# Altium PCB SOM_PCB_6Layer.PcbDoc (part 3 of 6)
Units mil, origin at the board's own origin, x right, y up, seen from the top; angles counter-clockwise.
Board outline 1230 x 2725 mil, 6 copper layers (Top Layer, GND+SHIELD, MidLayer1, MidLayer2, PWR, Bottom Layer), stack 60.8 mil thick; 76 components, 194 nets, 972 pads, 577 vias.
Unrouted connection lines stored in the file: 151.
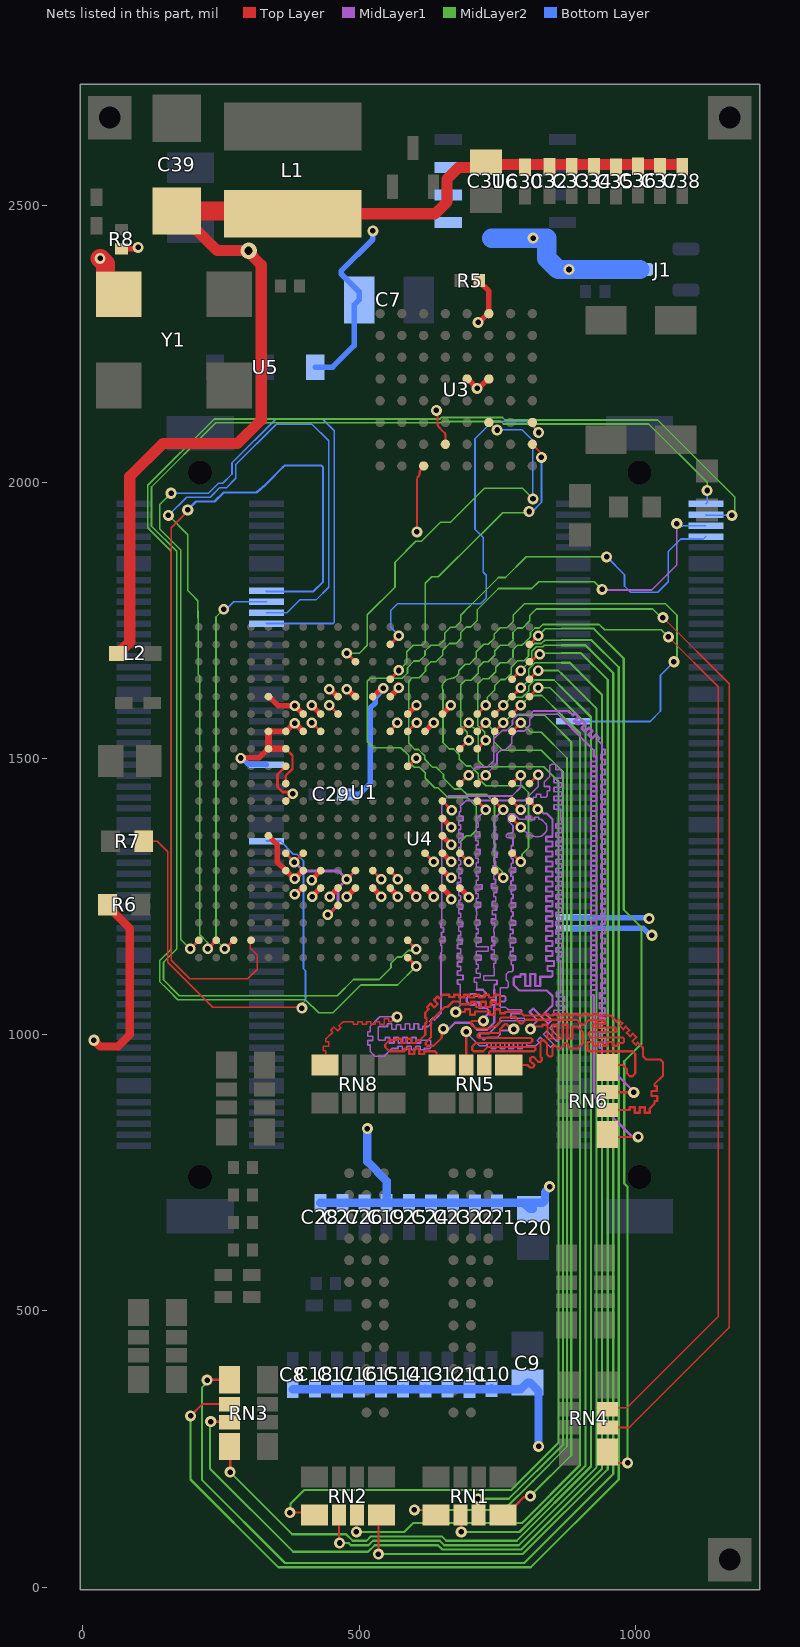
[diagram p6: the nets of this part, all layers, seen from the top]

## Via types
v1: diameter 19, hole 10, Top Layer to Bottom Layer, tented both sides, 352 vias
v2: diameter 20, hole 10, Top Layer to Bottom Layer, tented both sides, 223 vias
v3: diameter 20, hole 10, Top Layer to Bottom Layer, 1 vias
v4: diameter 30, hole 15, Top Layer to Bottom Layer, tented both sides, 1 vias

## Nets (pads, with @x,y where several pads share a name; then routed paths per layer and width w, separated by ;. In a path a pad name is that pad's centre, name@x,y a point inside that pad or via, vN(x,y) a via of type N, cw(c..) or ccw(c..) an arc to the next point about the centre after c; other vN are vias at no path point) (continued)
+3V3: C7.1 C8.2 C9.2 C10.2 C11.2 C12.2 C13.2 C14.2 C15.2 C16.2 C17.2 C18.2 C19.2 C20.2 C21.2 C22.2 C23.2 C24.2 C25.2 C26.2 C27.2 C28.2 C29.2 J1.3 R5.2 R6.2 R8.1 U1.E5 U1.E9 U1.E10 U1.E11 U1.E12 U1.F7 U1.F8 U1.F13 U1.F15 U1.G5 U1.G6 U1.G7 U1.G14 U1.H5 U1.H6 U1.K6 U1.M15 U1.N5 U1.N15 U1.P15 U1.R6 U1.R7 U1.R8 U1.R15 U1.T7 U1.T8 U1.T9 U1.T10 U1.T11 U1.T12 U1.T13 U1.T14 U1.T15 U1.T16 U3.A6 U3.D5 U3.D6 U3.G4 U3.H3 U4.71 U4.117 U4.118 U5.1 U6.1 U6.2 U6.3 Y1.4 | length 4143.3
  Top Layer w4: U1.K6@367.52,1454.49 367.52,1469.01 379.52,1481.01 379.52,1505.48 U1.H6@367.52,1517.48 ; v2(604.5,1910.06) 605,1910.56 605,2000.7 cw(c645.59,2000.7) 605.66,2008.01 cw(c609.59,2007.26) 606.74,2010.07 ; 606.76,2010.09 607.52,2010.85 ; 607.54,2010.87 ccw(c601.52,2016.87) 610.02,2016.87 610.02,2019.2 cw(c614.02,2019.2) 610.57,2021.23 cw(c645.59,2000.7) U3.H3@616.89,2029.41 ; v2(640,2130) 640.59,2129.41 cw(c637.76,2126.58) 641.76,2126.58 641.76,2108.15 ccw(c656.26,2108.15) 646.01,2097.9 655.07,2088.83 cw(c652.26,2085.99) 656.26,2085.99 656.26,2071.3 U3.G4@655,2070.04
  Top Layer w5: v1@383.27,1596 v1@383.38,1596 ; v1(383.58,1254) v1@385.39,1254 ; U1.T7@396.9,1265.51 U1.T7@399.02,1265.51 ; U1.R7@398.65,1297.01 U1.R7@399.02,1297.01 ; U1.F7@398.91,1580.47 U1.F7@399.02,1580.47 ; v1(414.76,1280) v1@414.76,1281.26 ; v1(414.76,1596) v1@414.87,1596 ; U1.F8@430.4,1580.47 U1.F8@430.51,1580.47 ; v1(446.26,1625.21) v1@447.51,1625.21 ; v1(447.11,1249.76) v1@447.11,1250.19 ; U1.E9@460.76,1611.97 U1.E9@462.01,1611.97 ; U1.T9@462.01,1265.09 U1.T9@462.01,1265.51 ; v1(477.76,1625.21) v1@479.01,1625.21 ; U1.E10@492.25,1611.97 U1.E10@493.5,1611.97 ; U1.T11@525,1265.14 U1.T11@525,1265.51 ; v1(540,1249.76) v1@540,1250.14 ; U1.T12@556.5,1264.39 U1.T12@556.5,1265.51 ; v1(570,1249.76) v1@570,1250.89 ; v1@603.74,1596.22 v1(604,1596.22) ; U1.R15@650.98,1297.01 U1.R15@652.24,1297.01 ; U1.F15@650.98,1580.47 U1.F15@650.98,1580.84 ; v1@665.48,1283.76 v1(666.73,1283.76) ; v1@666,1595.85 v1(666,1596.22) ; v1(666.73,1245.52) v1@666.73,1249.76 ; v1(698.23,1249) v1@698.23,1249.76
  Top Layer w10: R8.1@70,2422.48 97.48,2422.48 v2(100,2425) ; v1(285.69,1500.81) 285.87,1500.98 318.45,1500.98 334.94,1517.48 U1.H5@336.02,1517.48 ; U1.N5@336.02,1360 351.77,1344.25 351.77,1312.76 U1.R6@367.52,1297.01 367.89,1297.01 382.9,1282 v1(383.27,1282) 383.64,1282 U1.R7@398.65,1297.01 ; U1.G5@336.02,1548.98 U1.G6@367.52,1548.98 368.15,1548.98 383.27,1564.1 v1(383.9,1564.1) U1.G7@399.02,1548.98 ; U1.E5@336.02,1611.97 337.07,1611.97 353.56,1595.47 383.01,1595.47 v1(383.27,1595.21) ; v1@383.38,1596 U1.F7@398.91,1580.47 ; v1@385.39,1254 U1.T7@396.9,1265.51 ; v1@414.76,1281.26 U1.R8@430.51,1297.01 ; v1@414.87,1596 U1.F8@430.4,1580.47 ; v1(414.9,1249.9) U1.T8@430.51,1265.51 ; v1@447.11,1250.19 U1.T9@462.01,1265.09 ; v1@447.51,1625.21 U1.E9@460.76,1611.97 ; v1(477.76,1249.76) U1.T10@493.5,1265.51 ; v1@479.01,1625.21 U1.E10@492.25,1611.97 ; U1.T11@525,1265.14 v1@540,1250.14 ; U1.E11@525,1611.97 526.08,1611.97 539.47,1625.35 541.95,1625.35 v1(543.67,1627.07) ; U1.T12@556.5,1264.39 v1@570,1250.89 ; U1.E12@556.5,1611.97 v1(572.24,1627.72) ; U1.T13@587.99,1265.51 v1(603.74,1249.76) ; U1.F13@587.99,1580.47 v1@603.74,1596.22 ; U1.T14@619.49,1265.51 v1(635.24,1249.76) ; U1.G14@619.49,1548.98 v1(635.24,1564.72) ; U1.T15@650.98,1265.51 v1@666.73,1249.76 ; U1.P15@650.98,1328.5 v1(666.73,1312.76) ; U1.N15@650.98,1360 v1(666.73,1344.25) ; U1.M15@650.98,1391.5 v1(666.73,1375.75) ; U1.F15@650.98,1580.84 v1@666,1595.85 ; U1.R15@652.24,1297.01 v1@665.48,1283.76 ; U1.T16@682.48,1265.51 v1@698.23,1249.76 ; U3.D5@695.63,2186.89 696.87,2186.89 v2(713.76,2170) 716.22,2170 733.11,2186.89 U3.D6@735,2186.89 ; v2(715.62,2289.38) 717.5,2289.38 733.12,2305 U3.A6@735,2305 735,2345.75 717.52,2363.23 R5.2@717.52,2365
  Top Layer w12: U1.G5@336.02,1548.98 U1.H5@336.02,1517.48 U1.H6@367.52,1517.48
  Top Layer w15: v2(20,990) 31.29,978.71 63.71,978.71 85,1000 85,1192.52 44.88,1232.64 R6.2@44.88,1235
  Top Layer w35: v2(31.5,2405) 41.16,2395.34 41.16,2364.19 Y1.4@65,2340.35
  Bottom Layer w10: v1(285.69,1500.81) 288.13,1500.81 299.77,1489.17 331.54,1489.17 U4.71@332.44,1488.27 ; U5.1@420.55,2208.3 452.05,2208.3 491,2247.25 491,2321 C7.1@500,2330 500,2344.76 467.44,2377.32 467.44,2382.2 525,2439.76 v2(525,2455) ; C29.2@475.76,1435 500,1435 520,1455 520,1591.11 529.57,1600.68 529.57,1610.54 543.67,1624.64 v1(543.67,1627.07) ; U4.117@887.56,1192.99 1014.3,1192.99 1027.29,1180 v2(1030,1180) ; U4.118@887.56,1212.68 888.46,1211.77 1023.23,1211.77 v2(1025,1210)
  Bottom Layer w15: C8.2@380,358.47 C14.2@580.76,358.47 ; C28.2@430,695.76 C27.2@470,695.76 C19.2@550,695.76 ; v2(515,830) 515,770.23 550,735.23 C19.2@550,695.76 ; C14.2@580,359.24 C14.2@580.76,358.47 ; C13.2@620,359.24 C13.2@619.24,358.47 ; C10.2@740,360 C10.2@740,358.47 ; C20.2@815,684.41 809.29,684.41 C20.2@797.94,695.76 ; v2(825,255) 825,354.86 809.27,370.59 C9.2@805,370.59 792.88,358.47 C10.2@740,358.47 ; v2(845,725) 845,723.65 836.44,715.08 836.44,700.14 832.06,695.76 C20.2@797.94,695.76 ; C19.2@550,695.76 C25.2@590,695.76 C20.2@797.94,695.76 ; C14.2@580.76,358.47 C13.2@619.24,358.47 ; C13.2@619.24,358.47 C11.2@700,358.47 C10.2@740,358.47
  Bottom Layer w35: 740,2441.75 790,2441.75 v2(815,2441.75) 840,2441.75 840,2405 860,2385 v2(880,2385) J1.3@1008.27,2385
+VDD_INT: C30.2 C31.2 C32.2 C33.2 C34.2 C35.2 C36.2 C37.2 C38.2 C39.1 L1.2 L2.1 U1.F9 U1.G8 U1.G12 U1.G13 U1.J6 U1.J13 U1.L6 U1.L15 U1.P6 U1.P7 U1.P14 U1.R10 U1.R11 U1.R12 U1.U9 | length 2768.4
  Top Layer w5: U1.P6@367.52,1328.5 367.52,1327.87 382.63,1312.76 v1(382.63,1312.12) ; U1.L6@367.52,1422.99 v1(380.28,1435.75) ; U1.J6@367.52,1485.98 352.52,1470.98 352.52,1448.28 361.31,1439.49 382.52,1439.49 v1@383.27,1438.74 ; v1@383.27,1312.76 U1.P7@399.02,1328.5 ; v1(414.76,1564.72) U1.G8@430.51,1548.98 ; v1(443.76,1216.99) 445.03,1218.27 446.26,1218.27 U1.U9@462.01,1234.02 ; v1(446.26,1596) 446.37,1596 461.9,1580.47 U1.F9@462.01,1580.47 ; v1(477.76,1281.26) U1.R10@493.5,1297.01 ; U1.R11@525,1297.01 525,1296.63 540,1281.63 v1(540,1281.26) ; U1.R12@556.5,1297.01 556.5,1295.89 570,1282.38 v1(570,1281.26) ; U1.G12@556.5,1548.98 556.5,1550.47 569.26,1563.23 v1(569.26,1564.72) ; U1.J13@587.99,1485.98 588.74,1485.98 602.99,1500.24 v1(603.74,1500.24) ; U1.G13@587.99,1548.98 603.48,1564.46 v1(604.26,1564.46) ; U1.P14@619.49,1328.5 v1(635.24,1312.76) ; U1.L15@650.98,1422.99 666.73,1407.24 v1(667.59,1406.38)
  Top Layer w10: C39.1@170,2490.89 C39.1@171.37,2490.89 ; L1.2@374.98,2490.89 L1.2@380,2485.87 L1.2@465,2485.87 ; C32.2@845,2570.76 C33.2@885,2570.76 ; C34.2@925,2570.76 C35.2@965,2570.76 ; C36.2@1005,2570.76 C37.2@1045,2570.76
  Top Layer w20: L2.1@64.49,1690 67.44,1690 71.22,1693.78 71.22,1696.73 85,1710.51 85,2010 145,2070 280,2070 323,2113 323,2393.29 300,2416.29 v4(300,2419) ; C39.1@171.37,2490.89 243.26,2419 296,2419 v4@300,2415 ; L1.2@465,2485.87 637.66,2485.87 659,2507.2 659,2549 680,2570 720.59,2570 C31.2@727.15,2576.56 ; C31.2@730,2579.41 C31.2@727.15,2576.56 ; C38.2@1085,2570.76 1085,2574.24 1084.16,2575.09 1045,2575.09 1005,2575.09 965,2575.09 925,2575.09 885,2575.09 845,2575.09 800,2575.09 728.61,2575.09 C31.2@727.15,2576.56
  Top Layer w35: C39.1@171.37,2490.89 L1.2@374.98,2490.89
  MidLayer1 w5: v1(382.63,1312.12) 383.9,1312.12 399.76,1296.26 462.76,1296.26 v1(477.76,1281.26) 462.11,1265.62 462.11,1235.35 v1(443.76,1216.99)
A\O\E\: U1.C10 U3.F6 | length 748.7
  Top Layer w3: U3.F6@735,2108.15 735.68,2108.15 749.32,2094.5 v2(750,2094.5)
  Top Layer w5: v1(477.76,1690.71) U1.C10@493.5,1674.96
  MidLayer2 w3: v1(477.76,1690.71) 500.71,1690.71 515,1705 515,1760 565,1810 565,1855.42 602.79,1893.21 613.21,1893.21 647.42,1927.42 665.5,1927.42 727.08,1989 795.87,1989 v2(814.87,1970)
  Bottom Layer w3: v2(750,2094.5) 750.5,2095 795,2095 814.5,2075.5 814.5,1970.37 v2(814.87,1970)
A\R\E\: U1.B12 U3.F8 | length 712.4
  Top Layer w3: U3.F8@813.74,2108.15 813.74,2104.7 825,2093.44 v2(825,2090)
  Top Layer w5: U1.B12@556.5,1706.46 v1(572.24,1722.2)
  Bottom Layer w3: v1(572.24,1722.2) 557.24,1737.2 557.24,1767.72 569.52,1780 720,1780 730.5,1790.5 730.5,1831.54 725,1837.04 725,1900 710,1915 710,2078.69 741.31,2110 805,2110 v2(825,2090)
A\W\E\: U1.D12 U3.G8 | length 594
  Top Layer w3: U3.G8@813.74,2068.78 830,2052.52 v2(830,2045)
  Top Layer w5: U1.D12@556.5,1643.46 v1(572.24,1659.21)
  MidLayer2 w3: v1(572.24,1659.21) 586.62,1673.59 586.62,1693.39 598.23,1705 615,1705 620,1710 620,1815.68 620,1816.92 631.77,1828.69 643.23,1828.69 679.55,1865 680,1865 760,1945 806.25,1945 808.01,1946.76 v2(808.01,1946.99)
  Bottom Layer w3: v2(808.01,1946.99) 809.25,1945.75 812.54,1945.75 830.37,1963.58 830.37,2044.63 v2(830,2045)
ATAPI_PDIAG: U1.P19 U4.134 | length 1325.8
  Top Layer w5: U1.P19@776.97,1328.5 v1(792.72,1312.76)
  MidLayer2 w3: v1(792.72,1312.76) 795.02,1315.06 795.02,1326.76 806.72,1338.45 806.72,1438.28 794.27,1450.73 729.2,1450.73 715.72,1464.2 715.72,1472.3 701.8,1486.22 693.94,1486.22 681.37,1498.79 681.37,1506.66 670.98,1517.04 663.12,1517.04 652,1528.16 652,1623.49 651.34,1625.87 cw(c664.82,1629.62) 661.12,1643.13 670.48,1645.72 ccw(c666.73,1659.21) 676.63,1649.31 680.73,1653.41 680.73,1659.01 692.43,1670.71 700,1670.71 712.23,1682.94 712.23,1693.01 725.67,1706.46 733.78,1706.46 744.6,1717.28 744.6,1725.38 755.86,1736.64 767.74,1736.64 779,1747.9 779,1759.5 799.5,1780 1054.77,1780 1075.5,1759.27 1075.5,1680.5 v2(1070,1675)
  Bottom Layer w3: U4.134@887.56,1567.01 1027.01,1567.01 1045.75,1585.75 1045.75,1650.75 v2(1070,1675)
B\R\: R7.2 U4.76 | length 883
  Top Layer w3: R7.2@110.24,1350 135,1350 154,1331 154,1131 235.5,1049.5 394.88,1049.5 v2(396.38,1048)
  Bottom Layer w3: U4.76@332.44,1350.47 358.03,1350.47 369.27,1339.24 369.27,1338.45 380.99,1326.73 387.82,1326.73 399.55,1315 399.55,1119.19 403.01,1115.74 403.01,1061.99 394.99,1053.98 394.99,1049.39 v2(396.38,1048)
BMODE0: U1.W1 U4.60 | length 1720.4
  Top Layer w5: v1(194.29,1155.28) U1.W1@210.04,1171.02
  MidLayer2 w3: v2(160,1980) 139.5,1959.5 139.5,1915.3 177,1877.8 177,1172.57 v1(194.29,1155.28)
  Bottom Layer w3: v2(160,1980) 227.55,1980 245.78,1998.22 253.22,1998.22 270,2015 270,2035 350,2115 433.14,2115 455,2093.14 455,1745.93 453.24,1744.17 U4.60@332.44,1744.17
BMODE1: U1.W2 U4.59 | length 1618.2
  Top Layer w5: v1(225.79,1155.28) U1.W2@241.54,1171.02
  MidLayer2 w3: v2(155,1940) 190,1905 190,1803.98 197.74,1796.24 208.29,1785.69 208.29,1780.7 ; 208.29,1780.67 208.49,1754.65 ccw(c211.49,1754.7) 208.62,1753.84 209.04,1752.43 cw(c206.17,1751.55) 209.17,1751.55 209.17,1651.88 211.79,1649.26 211.79,1180.97 225.79,1166.97 v1(225.79,1155.28)
  Bottom Layer w3: v2(155,1940) 188,1973 230.45,1973 247.45,1990 260,1990 277,2007 277,2032.1 349.9,2105 415,2105 445,2075 445,1810 421.95,1786.95 392.55,1786.95 369.45,1763.86 U4.59@332.44,1763.86
BMODE2: U1.W3 U4.58 | length 732.1
  Top Layer w5: v1(257.28,1155.28) U1.W3@273.03,1171.02
  MidLayer2 w3: v1(255.25,1769.75) 254,1769 241,1756 241,1171.56 v1(257.28,1155.28)
  Bottom Layer w3: v1(255.25,1769.75) 260.46,1770.88 273.13,1783.54 U4.58@332.44,1783.54
BMODE3: U1.W4 U4.57 | length 1658.8
  Top Layer w3: v2(190,1950) 190,1947.72 160,1917.72 160,1796.24 160,1135 193.59,1101.41 298.69,1101.41 316.03,1118.75 316.03,1144.29 303.22,1157.1 303.22,1169.71 U1.W4@304.53,1171.02
  Bottom Layer w4: v2(190,1950) 205,1965 238.5,1965 255,1981.5 314.43,1981.5 330.39,1995.1 335.18,1999.79 ccw(c323.66,2011.6) 335.42,2000.03 362.07,2027.07 365,2030 432.07,2030 435,2027.07 435,1820 417.33,1802.33 333.34,1802.33 U4.57@332.44,1803.23
CAN0_RX: U1.R18 U4.153 | length 1226.6
  Top Layer w5: U1.R18@745.47,1297.01 746.61,1297.01 759.86,1283.76 v1(761,1283.76)
  MidLayer1 w3: v2(940,1806) 941,1805 1030,1805 1075,1850 v2(1075,1925)
  MidLayer2 w3: v1(761,1283.76) 760.68,1283.76 758.92,1285.52 758.92,1295.26 745.12,1309.06 745.12,1419.88 730,1435 695,1435 685.28,1444.72 672.45,1444.72 652.73,1464.44 652.73,1471.07 639.56,1484.24 632.93,1484.24 618.74,1498.43 618.74,1505.04 607.54,1516.23 600.94,1516.23 589.74,1527.43 589.74,1639.74 596.01,1646.01 608.75,1646.01 620.43,1657.69 620.43,1665.03 630.37,1674.97 639.29,1674.97 651.45,1687.12 651.45,1696.05 663.61,1708.2 675.8,1708.2 684.21,1716.61 684.21,1728.04 694.14,1737.97 702.3,1737.97 713.65,1749.32 713.65,1768.65 752.5,1807.5 812.7,1807.5 825.2,1820 926,1820 v2(940,1806)
  Bottom Layer w3: v2(1075,1925) 1080,1920 1085,1920 1086.34,1921.34 U4.153@1127.72,1921.34
CAN0_TX: U1.P16 U4.154 | length 1354.4
  Top Layer w5: U1.P16@682.48,1328.5 v1(698.23,1312.76)
  MidLayer2 w3: v1(698.23,1312.76) 684.23,1326.76 684.23,1350.05 694.18,1360 702.28,1360 712.23,1369.95 712.23,1413.04 696.27,1429 661,1429 642.78,1447.22 636.98,1447.22 619.76,1464.44 619.76,1474.01 609.54,1484.24 599.94,1484.24 589.74,1494.44 589.74,1505.26 575.77,1519.23 525.77,1519.23 515,1530 515,1640 520.21,1645.21 578.04,1645.21 587.6,1654.77 587.6,1664.45 599.57,1676.43 609.26,1676.43 619.35,1686.52 619.35,1694.62 629.54,1704.81 644.81,1704.81 655,1715 655,1727 665.45,1737.45 673.55,1737.45 684,1747.9 684,1759.27 699.73,1775 700,1775 752.45,1827.45 764.95,1827.45 802.5,1865 v2(948.18,1865)
  Bottom Layer w3: v2(948.18,1865) 980.5,1832.68 980.5,1812.22 991.61,1801.11 1040.61,1801.11 1059.5,1820 1059.5,1874.5 1082.25,1897.25 1123.31,1897.25 U4.154@1127.72,1901.65
CAN1_RX: U1.W13 U4.151 | length 2592.8
  Top Layer w5: U1.W13@587.99,1171.02 587.99,1170.51 603.22,1155.28 v1(603.22,1154.76)
  MidLayer2 w3: v1(603.22,1154.76) 600.92,1152.46 589.22,1152.46 577.41,1140.64 569.3,1140.64 557.93,1129.26 557.93,1121.16 536.77,1100 490,1100 460.5,1070.5 174.7,1070.5 163.96,1081.24 151.75,1093.45 146,1099.2 146,1131 170,1155 170,1513.78 170,1874.9 124.5,1920.4 124.5,1991.42 240.58,2107.5 649.32,2107.5 651.82,2110 756.92,2110 761.42,2105.5 1024.5,2105.5 1130,2000 v2(1130,1985)
  Bottom Layer w3: U4.151@1127.72,1960.71 1130,1962.99 v2(1130,1985)
CAN1_TX: U1.Y13 U4.152 | length 2725.6
  Top Layer w5: U1.Y13@587.99,1139.53 588.1,1139.53 603.63,1124 v1(603.74,1124)
  MidLayer2 w3: v1(603.74,1124) 569.74,1090 503.23,1090 452.73,1039.5 426.8,1039.5 402.8,1063.5 171.8,1063.5 154.06,1081.24 151.75,1083.55 139,1096.3 139,1133.9 160,1154.9 160,1875 117.5,1917.5 117.5,1994.32 237.68,2114.5 646.42,2114.5 648.92,2117 759.82,2117 764.32,2112.5 1040.73,2112.5 1180,1973.23 1180,1945 v2(1175,1940)
  Bottom Layer w3: U4.152@1127.72,1941.02 1128.74,1940 v2(1175,1940)
DDR_A0: RN1.1 U1.G19 | length 1746.4
  Top Layer w3: v2(600,140) 630,140 RN1.1@639.5,130.5
  Top Layer w5: U1.G19@776.97,1548.98 792.72,1564.72 v1(793.01,1564.72)
  MidLayer2 w3: v1(793.01,1564.72) 810.51,1547.23 830.01,1547.23 876.5,1500.74 876.5,254.13 814.31,191.94
  MidLayer2 w4: v2(600,140) 762.37,140 814.31,191.94
DDR_A1: RN1.3 U1.G17 | length 1652.6
  Top Layer w4: v2(715,160) 715,131.8 RN1.3@716.3,130.5
  Top Layer w5: U1.G17@713.98,1548.98 v1(729.72,1564.72)
  MidLayer2 w3: v1(729.72,1564.72) 744.01,1550.44 744.01,1530.64 759.65,1515 830,1515 865,1480
  MidLayer2 w4: v2(715,160) 771.06,160 869,257.94 869,1476 865,1480
DDR_A2: RN1.2 U1.E20 | length 1784.5
  Top Layer w4: RN1.2@683.65,130.5 685,129.15 v2(685,100)
  Top Layer w5: U1.E20@808.46,1611.97 824.21,1627.72 v1(824.21,1628)
  MidLayer2 w3: v1(824.21,1628) 845.48,1628 866.75,1606.73
  MidLayer2 w4: v2(685,100) 790.25,100 910,219.75 910,1563.48 866.75,1606.73
DDR_A3: RN1.4 U1.G18 | length 1630.6
  Top Layer w4: RN1.4@760.5,130.5 766,130.5 783,147.5 783,148 797.69,162.69 807.69,162.69 v2(810,165)
  Top Layer w5: U1.G18@745.47,1548.98 v1(761.22,1564.72)
  MidLayer2 w3: v1(761.22,1564.72) 775.22,1578.72 835,1578.72 866.75,1546.97
  MidLayer2 w4: v2(810,165) 884,239 884,1529.72 866.75,1546.97
DDR_A4: RN2.1 U1.G16 | length 2049.7
  Top Layer w4: v2(375,135) 415,135 RN2.1@419.5,130.5
  Top Layer w5: U1.G16@682.48,1548.98 v1(698.23,1564.72)
  MidLayer2 w3: v1(698.23,1564.72) 715.72,1547.23 715.72,1495.93 726.66,1485 834.34,1485 855,1464.34
  MidLayer2 w4: v2(375,135) 376,136 376,151 401,176 775.75,176 861,261.25 861,1458.34 855,1464.34
DDR_A5: RN2.3 U1.F19 | length 1975.8
  Top Layer w3: v2(495,100) 495,129.2 RN2.3@496.3,130.5
  Top Layer w5: U1.F19@776.97,1580.47 777.08,1580.47 792.61,1596 v1(792.72,1596)
  MidLayer2 w3: v1(792.72,1596) 792.72,1596.22 810.5,1614 831,1614 866.75,1578.25
  MidLayer2 w4: v2(495,100) 582,100 595,113 598,116 794.94,116 900,221.06 900,1545 866.75,1578.25
DDR_A6: RN2.2 U1.D20 | length 2112.4
  Top Layer w4: RN2.2@463.65,130.5 463.65,81.35 v2(465,80)
  Top Layer w5: U1.D20@808.46,1643.46 v1(824.21,1659.2)
  MidLayer2 w3: v1(824.21,1659.2) 860.79,1659.21 866.75,1653.25
  MidLayer2 w4: v2(465,80) 481.06,80 485.06,76 517.06,76 525.06,84 646.34,84 654.34,76 788.88,76 930,217.12 930,1590 866.75,1653.25
DDR_A7: RN2.4 U1.C20 | length 2148.1
  Top Layer w4: v2(535,60) 535,125 RN2.4@540.5,130.5
  Top Layer w5: U1.C20@808.46,1674.96 810.9,1674.96 824.14,1688.2 v1(826.72,1688.2)
  MidLayer2 w3: v1(826.72,1688.2) 829.22,1690.71 866.75,1690.71
  MidLayer2 w4: v2(535,60) 796.31,60 950,213.69 950,1642.23 901.53,1690.71 866.75,1690.71
DDR_A8: RN3.4 U1.F18 | length 2411.9
  Top Layer w4: RN3.4@265.5,254.5 266.84,253.16 v2(266.84,208.16)
  Top Layer w5: U1.F18@745.47,1580.47 745.58,1580.47 761.11,1596 v1(761.22,1596)
  MidLayer2 w3: v1(761.22,1596) 761.22,1596.22 775.5,1610.5 795.3,1610.5 806.86,1622.06 806.86,1630.44 818.41,1642 853,1642 866.75,1628.25
  MidLayer2 w4: v2@266.84,216.84 v2(266.84,208.16) 379,96 476.37,96 488.37,84 513.75,84 521.75,92 649.66,92 657.66,84 785.57,84 920,218.43 920,1575 866.75,1628.25
DDR_A9: RN3.3 U1.E19 | length 2585.4
  Top Layer w4: v2(231.55,299.63) 264.57,299.63 RN3.3@265.5,298.7
  Top Layer w5: U1.E19@776.97,1611.97 v1(792.72,1627.72)
  MidLayer2 w3: v1(792.72,1627.72) 807,1642 807,1661.8 818.41,1673.21 866.75,1673.21
  MidLayer2 w4: v2(231.55,299.63) 230,298.07 230,215 381,64 516.37,64 528.37,76 643.03,76 651.03,68 793,68 940,215 940,1615 881.79,1673.21 866.75,1673.21
DDR_A10: RN4.1 U1.B20 | length 1735.3
  Top Layer w4: RN4.1@950,245 950,242.02 967,225.02 v2(986,225.02)
  Top Layer w5: U1.B20@808.46,1706.46 v1(824.21,1722.2)
  MidLayer2 w3: v1(824.21,1722.2) 837.01,1735 866.75,1735
  MidLayer2 w4: 866.75,1735 925,1735 979,1681 979,1226.42 1011,1194.42 1011,983.09 979.98,952.08 979.98,730.75 986,724.73 v2(986,225.02)
DDR_A11: RN3.2 U1.F17 | length 2928.7
  Top Layer w4: v2(195,310) 216.35,331.35 RN3.2@265.5,331.35
  Top Layer w5: U1.F17@713.98,1580.47 714.09,1580.47 729.61,1596 v1(729.72,1596)
  MidLayer2 w3: v1(729.72,1596) 729.72,1596.22 732.03,1598.52 732.03,1610.22 745.85,1624.05 745.85,1632.15 756.49,1642.78 764.59,1642.78 775.22,1653.41 775.22,1665.22 786.81,1676.81 786.92,1676.71 798.52,1676.71 806.72,1684.91 806.72,1696.51 806.61,1696.61 818.31,1708.31 818.41,1708.2 830.01,1708.2 836.01,1714.2 866.75,1714.2
  MidLayer2 w4: v2(195,310) 195,195 354,36 811,36 970,195 970,1665 920.8,1714.2 866.75,1714.2
DDR_A12: RN3.1 U1.D19 | length 2786.4
  Top Layer w4: v2(225,375) 225.5,375.5 RN3.1@265.5,375.5
  Top Layer w5: U1.D19@776.97,1643.46 v1(792.74,1659.2)
  MidLayer2 w3: v1(792.74,1659.2) 812.72,1679.21 812.72,1694 820.92,1702.2 832.5,1702.2 835.29,1705 866.75,1705
  MidLayer2 w4: v2(225,375) 225,370.67 215.55,361.23 215.55,194.44 366,44 799,44 960,205 960,1654.71 909.71,1705 866.75,1705
DDR_BA0: RN4.3 U1.H17 | length 2083.1
  Top Layer w3: RN4.3@950,321.8 953.2,325 985,325 1150,490 1150,1630 v2(1060,1720)
  Top Layer w5: U1.H17@713.98,1517.48 v1(729.72,1533.23)
  MidLayer2 w3: v1(729.72,1533.23) 727.42,1535.53 727.42,1547.23 715,1559.65 715,1635 724.21,1644.21 734.52,1644.21 747.22,1656.91 747.22,1665.01 755.42,1673.21 768.21,1673.21 778.72,1683.72 778.72,1696.51 786.92,1704.71 794.71,1704.71 800,1710 800.16,1709.84 806.72,1716.41 806.72,1716.72 810.21,1720.21 810.21,1728 818.41,1736.2 826.2,1736.2 832.5,1742.5 935,1742.5 944.62,1732.88 1047.12,1732.88 v2(1060,1720)
DDR_BA1: RN4.2 U1.H16 | length 2201.8
  Top Layer w3: RN4.2@950,289.15 989.15,289.15 1170,470 1170,1635 v2(1050,1755)
  Top Layer w5: U1.H16@682.48,1517.48 v1(698.23,1533.23)
  MidLayer2 w3: v1(698.23,1533.23) 695.93,1535.53 695.93,1547.23 684.23,1558.93 684.23,1633.52 692.43,1641.72 703.04,1641.72 715.72,1654.41 715.72,1665.01 725.71,1675 733.81,1675 745.47,1686.66 745.47,1694.76 755.59,1704.88 769.88,1704.88 778.82,1713.82 778.82,1716.3 778.72,1716.41 778.72,1728 786.92,1736.2 796.2,1736.2 809.2,1749.2 809.2,1758.78 820.92,1770.5 1031.42,1770.5 v2@1041.92,1760
DDR_D0: RN5.4 U1.L18 | length 1597.9
  Top Layer w4: RN5.4@650,945 640,955 640,967.66 637.66,970 620,970 618,970 618,965 609,965 609,975 600,975 600,965 591,965 591,975 582,975 582,970 567.5,970 555,970 547.5,977.5 547.5,982.5 555,990 565,990 567,990 567,992.5 576,992.5 576,985 585,985 585,992.5 594,992.5 594,985 603,985 603,990 610,990 620,1000 620,1010 620,1021 622,1021 622,1030 620,1030 620,1040 625,1045 626.41,1046.41 622.88,1049.95 629.24,1056.31 636.31,1049.24 642.68,1055.61 635.61,1062.68 641.97,1069.04 645.51,1065.51 649.41,1069.41 652.5,1072.5 663.44,1072.5 663.44,1068 672.44,1068 672.44,1072.5 681.44,1072.5 681.44,1067.87 690.44,1067.87 690.44,1072.5 699.44,1072.5 699.44,1067.5 708.44,1067.5 708.44,1072.5 717.44,1072.5 717.44,1067.5 726.44,1067.5 726.44,1072.5 735.44,1072.5 735.44,1067.5 744.44,1067.5 744.44,1072.5 746.44,1072.5 752.5,1072.5 755,1070 755,1057.34 752.66,1055 747.5,1055 747.5,1059.5 738.5,1059.5 738.5,1050 729.5,1050 729.5,1059.5 720.5,1059.5 720.5,1050 711.5,1050 711.5,1059.5 702.5,1059.5 702.5,1055 700.5,1055 685,1055 680,1060 670,1060 660,1050 655,1050 630,1025 630,995 620.66,985.66 620.66,982.34 623,980 635,980 649.72,994.72 649.72,1004.77 v2@654.08,1009.12
  Top Layer w5: U1.L18@745.47,1422.99 745.47,1422.88 761,1407.35 v1(761,1407.24)
  MidLayer1 w3: 744.72,1081.24 744.72,1090.74 749.72,1090.74 749.72,1098.74 725.69,1098.74 725.69,1106.74 744.72,1106.74 744.72,1110 744.72,1120 744.72,1121.5 743.72,1121.5 743.72,1129.5 747.22,1129.5 747.22,1137.5 739.72,1137.5 739.72,1145.5 744.72,1145.5 744.72,1153.5 739.72,1153.5 739.72,1161.5 745.14,1161.5 745.14,1169.5 740.24,1169.5 740.24,1177.5 744.72,1177.5 744.72,1185.5 743.72,1185.5 743.72,1193.5 745.56,1193.5 745.56,1201.5 739.72,1201.5 739.72,1209.5 747.22,1209.5 747.22,1217.5 741.22,1217.5 741.22,1225.5 748.65,1225.5 748.65,1233.5 741.26,1233.5 741.26,1241.5 747.22,1241.5 747.22,1249.5 743.72,1249.5 743.72,1257.5 749.16,1257.5 749.16,1265.5 739.72,1265.5 739.72,1273.5 747,1273.5 747,1281.5 743.72,1281.5 743.72,1289.5 747,1289.5 747,1297.5 742.27,1297.5 742.27,1305.5 747.22,1305.5 747.22,1313.5 743.72,1313.5 743.72,1321.5 749.72,1321.5 749.72,1329.5 742.77,1329.5 742.77,1337.5 747.22,1337.5 747.22,1345.5 743.72,1345.5 743.72,1353.5 749.72,1353.5 749.72,1361.5 743.55,1361.5 743.55,1369.5 747.22,1369.5 747.22,1377.5 744,1377.5 744,1385.5 744.72,1385.5 744.72,1390.96 v1(761,1407.24)
  MidLayer1 w4: v2@658.94,1006.74 673.7,1021.5 701.63,1021.5 714.13,1009 731.63,1009 744.72,1022.09 744.72,1051.66 744.72,1053.67 739.72,1053.67 739.72,1062.67 748,1062.67 748,1071.67 744.72,1071.67 744.72,1081.24
  other v2: 652.48,1010.72
DDR_D1: RN5.2 U1.M19 | length 1589.4
  Top Layer w4: RN5.2@726.85,945 735,953.15 735,967.66 737.34,970 815,970 ccw(c815,974.34) 819.34,974.34 ccw(c815.69,974.34) 815.69,978 733,978 725,970 707.34,970 705,972.34 705,978.83 711.17,985 810,985 813.34,988.34 813.34,991.66 811,994 717.34,994 715,996.34 715,1000 718.03,1003.03 752.66,1003.03 755,1005.37 755,1010 764.34,1019.34 766.72,1019.34 776.06,1010 v3(780,1010)
  Top Layer w5: U1.M19@776.97,1391.5 v1(792.72,1375.75)
  MidLayer1 w3: v3(780,1010) 777.5,1007.5 755,1007.5 755,1000 750,995 731.6,995 727.79,991.19 724.44,991.19 718.37,997.26 718.37,999.74 720.13,1001.5 734.73,1001.5 758.23,1025 800,1025 800,1030 775,1030 775,1037.98 792.83,1037.98 794.59,1039.74 794.59,1043.24 792.83,1045 770,1045 765,1050 756.76,1050 755,1051.76 755,1058.24 756.76,1060 763.24,1060 765,1061.76 765,1068.24 763.24,1070 757.26,1070 755.5,1071.76 755.5,1085 768.24,1085 770,1086.76 770,1095.4 766.19,1099.21 766.19,1108.95 767.02,1109.78 771.12,1113.88 774.84,1113.88 ccw(c774.84,1117.76) 778.72,1117.76 778.72,1125 778.72,1126.5 775.22,1126.5 775.22,1134.5 783.64,1134.5 783.64,1142.5 773.72,1142.5 773.72,1150.5 778.72,1150.5 778.72,1158.5 773.72,1158.5 773.72,1166.5 783.72,1166.5 783.72,1174.5 773.72,1174.5 773.72,1182.5 778.72,1182.5 778.72,1190.5 773.72,1190.5 773.72,1198.5 783.72,1198.5 783.72,1206.5 775.22,1206.5 775.22,1214.5 778.72,1214.5 778.72,1222.5 775.22,1222.5 775.22,1230.5 783.72,1230.5 783.72,1238.5 775.22,1238.5 775.22,1246.5 778.72,1246.5 778.72,1254.5 775.22,1254.5 775.22,1262.5 783.72,1262.5 783.72,1270.5 775,1270.5 775,1278.5 778.72,1278.5 778.72,1286.5 775,1286.5 775,1294.5 783.17,1294.5 783.17,1302.5 775.22,1302.5 775.22,1310.5 778.72,1310.5 778.72,1318.5 775.22,1318.5 775.22,1326.5 782.67,1326.5 782.67,1334.5 775.22,1334.5 775.22,1342.5 778.72,1342.5 778.72,1356.31 768.69,1356.31 766.38,1358.62 766.38,1361.11 770.14,1364.86 776.4,1364.86 778.72,1367.18 778.72,1378.05 769.98,1386.79 769.98,1396.42 773.55,1400 780,1400 790,1390 800,1390 801.5,1390 801.5,1395 809.5,1395 809.5,1388.83 817.5,1388.83 817.5,1393.82 825.5,1393.82 825.5,1390 830,1390 837.62,1382.38 cw(c831.87,1376.63) 840,1376.63 840,1373.27 cw(c828.93,1373.27) 836.76,1365.44 833.51,1362.2 cw(c823.99,1371.72) 824.04,1358.25 cw(c823.99,1371.72) 823.99,1358.25 823.12,1358.25 cw(c823.12,1389.42) 801.08,1367.38 v1(792.72,1375.75)
DDR_D2: RN5.3 U1.L19 | length 1645.4
  Top Layer w4: v2(694,1005.5) 694,945.2 RN5.3@694.2,945
  Top Layer w5: U1.L19@776.97,1422.99 v1(792.72,1407.24)
  MidLayer1 w3: v2(694,1005.5) 694,1004.1 718.1,980 730,980 731.5,980 731.5,985 739.5,985 739.5,975 747.5,975 747.5,985 755.5,985 755.5,975 763.5,975 763.5,985 771.5,985 771.5,975 779.5,975 779.5,985 787.5,985 787.5,975 795.5,975 795.5,985 803.5,985 803.5,980 811.5,980 820,980 825,985 826.06,986.06 822.53,989.6 828.18,995.25 846.41,977.02 852.07,982.68 833.84,1000.91 839.5,1006.57 857.73,988.33 863.39,993.99 845.15,1012.22 850.81,1017.88 854.35,1014.35 861,1021 865,1025 865,1035 865,1036.5 852.26,1036.5 852.26,1044.5 872.5,1044.5 872.5,1052.5 857.5,1052.5 857.5,1060.5 872.5,1060.5 872.5,1068.5 857.5,1068.5 857.5,1076.5 865,1076.5 865,1081.24 865,1084.38 ; v1(792.72,1407.24) 804.09,1418.62 813.71,1418.62 815.47,1420.38 815.47,1430 819.2,1430 820.7,1430 820.7,1435 828.7,1435 828.7,1430 835.61,1430 838.24,1430 840.65,1432.4 840.65,1441.26 845,1441.26 845,1449.26 835,1449.26 835,1457.26 845,1467.26 845,1486.54 848.26,1489.8 856.26,1489.8 856.26,1480 863.24,1480 866.75,1476.49 866.75,1463.91 852.97,1463.91 852.97,1455.91 866.75,1455.91 866.75,1447.91 852.97,1447.91 852.97,1439.91 866.75,1439.91 866.75,1431.91 852.97,1431.91 852.97,1423.91 866.75,1423.91 866.75,1415.91 852.97,1415.91 852.97,1407.91 865,1407.91 865,1396.64 865,1391.07 865,1389.57 866.75,1389.57 866.75,1381.57 856.5,1381.57 856.5,1373.57 866.75,1373.57 866.75,1365.57 856.5,1365.57 856.5,1357.57 866.75,1357.57 866.75,1349.57 856.5,1349.57 856.5,1341.57 866.75,1341.57 866.75,1333.57 856.5,1333.57 856.5,1325.57 866.75,1325.57 866.75,1317.57 856.5,1317.57 856.5,1309.57 866.75,1309.57 866.75,1301.57 856.5,1301.57 856.5,1293.57 866.75,1293.57 866.75,1285.57 856.5,1285.57 856.5,1277.57 866.75,1277.57 866.75,1269.57 856.5,1269.57 856.5,1261.57 866.75,1261.57 866.75,1253.57 856.5,1253.57 856.5,1245.57 866.75,1245.57 866.75,1237.57 856.5,1237.57 856.5,1229.57 866.75,1229.57 866.75,1221.57 856.5,1221.57 856.5,1213.57 866.75,1213.57 866.75,1205.57 856.5,1205.57 856.5,1197.57 866.75,1197.57 866.75,1189.57 856.5,1189.57 856.5,1181.57 866.75,1181.57 866.75,1173.57 856.5,1173.57 856.5,1165.57 866.75,1165.57 866.75,1157.57 856.5,1157.57 856.5,1149.57 866.75,1149.57 866.75,1141.57 859.19,1141.57 859.19,1133.57 865,1133.57 865,1084.38 ; 865,1093.57 865,1084.38
DDR_D3: RN5.1 U1.L20 | length 1584.6
  Top Layer w4: RN5.1@771,945 805,945 809.34,940.66 812.66,940.66 ccw(c812.66,945) 817,945 ccw(c813.5,945) 813.5,948.5 810,952 810,957.53 812.34,959.88 815.66,959.88 824.29,951.24 828.45,951.24 830.53,953.33 830.53,957.75 828.32,959.96 828.32,987.66 830.66,990 835,990 840,985 840,965 844.34,960.66 847.66,960.66 850,963 850,977.66 852.34,980 855.66,980 860.66,975 865,975 870,980 870,982.66 872.34,985 875.99,985 878.33,982.66 878.33,978.83 882.16,975 896,975 905,984 905,1005 895,1015 891.06,1015 886,1015 886,993.4 877,993.4 877,1018 868,1018 868,993.4 859,993.4 859,1018 850,1018 850,993.4 841,993.4 841,1018 832,1018 832,1015 830,1015 819.33,1015 814.33,1010 v2(810,1010)
  Top Layer w5: U1.L20@808.46,1422.99 808.58,1422.99 823.75,1407.82 v1(823.86,1407.82)
  MidLayer1 w4: v2(810,1010) 810,1011.5 810,1013 823.39,1026.39 808.7,1041.09 815.06,1047.45 842.42,1020.1 848.78,1026.46 836.12,1039.12 843.5,1046.5 850,1053 850,1070 840,1080 790,1080 780,1090 780,1102.66 782.34,1105 790,1105 792,1105 792,1109.28 801,1109.28 801,1088 810,1088 810,1110 819,1110 819,1088 828,1088 828,1105 834.14,1105 848.27,1105 850,1106.73 850,1113.46 850,1115.46 841.22,1115.46 841.22,1124.46 852.69,1124.46 852.69,1133.46 838.97,1133.46 838.97,1142.46 850,1142.46 850,1151.46 838.97,1151.46 838.97,1160.46 850,1160.46 850,1169.46 838.97,1169.46 838.97,1178.46 850,1178.46 850,1187.46 838.97,1187.46 838.97,1196.46 850,1196.46 850,1205.46 838.97,1205.46 838.97,1214.46 850,1214.46 850,1223.46 838.97,1223.46 838.97,1232.46 850,1232.46 850,1241.46 838.97,1241.46 838.97,1250.46 850,1250.46 850,1259.46 838.97,1259.46 838.97,1268.46 850,1268.46 850,1277.46 838.97,1277.46 838.97,1286.46 850,1286.46 850,1295.46 838.97,1295.46 838.97,1304.46 850,1304.46 850,1313.46 838.97,1313.46 838.97,1322.46 850,1322.46 850,1331.46 838.97,1331.46 838.97,1340.46 850,1340.46 850,1349.46 838.97,1349.46 838.97,1358.46 850,1358.46 850,1374.31 850,1389.94 839.62,1400.32 834.49,1400.32 826.99,1407.82 v1(823.86,1407.82)
DDR_D4: RN6.4 U1.L17 | length 1556.7
  Top Layer w4: v2(725,1025) 705.13,1025 702.78,1022.66 702.78,1019.34 711.1,1011.03 736.03,1011.03 740,1015 746.87,1015 755,1023.13 755,1028.66 757.34,1031 775.34,1031 777.34,1033 782.34,1033 785,1030.34 785,1027.63 792.16,1020.47 795.47,1020.47 802,1027 894.31,1027 903.56,1017.75 906.88,1017.75 915.41,1026.28 943.28,1026.28 945.62,1023.94 945.62,1020.62 945,1020 925.34,1020 923,1017.66 923,1014.34 924.51,1012.83 964.24,1012.83 966.41,1010.66 966.41,1007.34 964.07,1005 918,1005 915.66,1002.66 915.66,999.34 920,995 977,995 979.34,992.66 979.34,987.34 977,985 975.38,985 968.34,985 968.34,980 959.34,980 959.34,987 950.34,987 950.34,980 941.34,980 941.34,987 932.34,987 932.34,980 923.34,980 923.34,987 918.84,987 914.34,987 913,985.66 913,972.34 915.34,970 995,970 1000,965 1000,930 995,925 990,925 985,930 985,937.5 977.5,945 969.5,945
  Top Layer w5: U1.L17@713.98,1422.99 v1(729.72,1407.24)
  MidLayer1 w3: 713.22,1081.24 713.22,1093.76 713.22,1095.26 708.22,1095.26 708.22,1103.26 719.69,1103.26 719.69,1111.26 712.23,1111.26 712.23,1119.26 715.72,1119.26 715.72,1127.26 712.23,1127.26 712.23,1135.26 721.4,1135.26 721.4,1143.26 712.23,1143.26 712.23,1151.26 733.72,1151.26 733.72,1159.26 712.23,1159.26 712.23,1167.26 721.43,1167.26 721.43,1175.26 712.23,1175.26 712.23,1183.26 715.72,1183.26 715.72,1191.26 712.23,1191.26 712.23,1199.26 718.43,1199.26 718.43,1207.26 712.23,1207.26 712.23,1215.26 713.22,1215.26 713.22,1223.26 712.23,1223.26 712.23,1231.26 720.41,1231.26 720.41,1239.26 712.23,1239.26 712.23,1247.26 715.72,1247.26 715.72,1255.26 711.77,1255.26 711.77,1263.26 722.42,1263.26 722.42,1271.26 712.23,1271.26 712.23,1279.26 715.72,1279.26 715.72,1287.26 712.23,1287.26 712.23,1295.26 719.42,1295.26 719.42,1303.26 712.23,1303.26 712.23,1311.26 715.72,1311.26 715.72,1319.26 711.53,1319.26 711.53,1327.26 718.92,1327.26 718.92,1335.26 712.23,1335.26 712.23,1343.26 715.72,1343.26 715.72,1351.26 711.02,1351.26 711.02,1359.26 718.69,1359.26 718.69,1367.26 712.23,1367.26 712.23,1375.26 716,1375.26 716,1383.26 713.22,1383.26 713.22,1384.87 713.22,1390.74 v1(729.72,1407.24)
  MidLayer1 w4: 713.22,1081.24 723.76,1081.24 729.34,1075.66 729.34,1072.34 727,1070 721,1070 711,1070 711,1073.55 702,1073.55 696.1,1067.65 ccw(c698.75,1065) 695,1065 695,1060 700.01,1054.99 701.33,1053.67 702.84,1053.67 708.4,1053.67 708.4,1058.67 717.4,1058.67 717.4,1048.67 726.4,1048.67 730.09,1048.67 734.38,1044.38 734.38,1038.25 725,1028.87 v2(725,1025)
DDR_D5: RN6.3 U1.K16 | length 1589.9
  Top Layer w4: RN6.3@949.5,896.3 950.05,895.75 v2(997.25,895.75)
  Top Layer w5: U1.K16@682.48,1454.49 682.6,1454.49 698.11,1470 v1(698.23,1470)
  MidLayer1 w3: v1(698.23,1470) 712.73,1484.5 732.29,1484.5 743.72,1495.93 743.72,1535.53 758.92,1550.72 767.02,1550.72 777.66,1561.36 777.66,1569.47 788.3,1580.11 809.89,1580.11 815.79,1586 866.75,1586
  MidLayer1 w4: 866.75,1586 879,1586 885.75,1579.25 887.16,1577.84 890.7,1581.37 897.06,1575.01 889.99,1567.94 896.35,1561.58 903.42,1568.65 909.79,1562.28 902.72,1555.21 909.08,1548.85 916.15,1555.92 922.52,1549.55 915.45,1542.48 921.81,1536.12 928.88,1543.19 935.24,1536.83 931.71,1533.29 935,1530 940,1525 940,1518 940,1516 945,1516 945,1507 938,1507 938,1498 945,1498 945,1489 938,1489 938,1480 945,1480 945,1471 938,1471 938,1462 945,1462 945,1453 938,1453 938,1444 945,1444 945,1435 938,1435 938,1426 945,1426 945,1417 938,1417 938,1408 945,1408 945,1399 938,1399 938,1390 945,1390 945,1381 938,1381 938,1372 945,1372 945,1363 938,1363 938,1354 945,1354 945,1345 938,1345 938,1336 945,1336 945,1327 938,1327 938,1318 945,1318 945,1309 938,1309 938,1300 945,1300 945,1291 938,1291 938,1282 945,1282 945,1273 938,1273 938,1264 945,1264 945,1255 938,1255 938,1246 945,1246 945,1237 938,1237 938,1228 945,1228 945,1219 938,1219 938,1210 945,1210 945,1201 938,1201 938,1192 945,1192 945,1183 938,1183 938,1174 945,1174 945,1165 938,1165 938,1156 945,1156 945,1147 938,1147 938,1138 945,1138 945,1129 938,1129 938,1120 945,1120 945,1111 938,1111 938,1102 945,1102 945,1093 938,1093 938,1084 945,1084 945,1075 935.56,1075 935.56,1066 945,1066 945,1057 935,1057 935,1048 945,1048 945,1039 935,1039 935,1030 945,1030 945,1021 935,1021 935,1012 945,1012 945,1003 935,1003 935,994 945,994 945,985 935,985 935,976 940,976 940,965 ccw(c965.35,965) 947.42,947.08 997.25,897.25 v2(997.25,895.75)
DDR_D6: RN6.2 U1.K20 | length 1592.9
  Top Layer w4: v2(675,1041) 690,1041 692,1041 692,1046 701,1046 701,1036 710,1036 710,1042 737,1042 737,1036 746,1036 746,1046 755,1046 755,1039 764,1039 764,1041 773,1041 791.69,1041 797.69,1035 824.69,1035 829.19,1035 833.69,1035 833.69,1037 842.69,1037 842.69,1035 851.69,1035 851.69,1037 860.69,1037 860.69,1035 869.69,1035 869.69,1037 878.69,1037 878.69,1035 887.69,1035 887.69,1037 896.69,1037 896.69,1035 905.69,1035 905.69,1037 914.69,1037 914.69,1035 923.69,1035 923.69,1037 932.69,1037 932.69,1034.28 941.69,1034.28 941.69,1035 945,1035 955,1035 965,1025 966.41,1023.59 969.95,1027.12 976.31,1020.76 971.97,1016.41 978.33,1010.05 982.68,1014.39 989.04,1008.03 984.7,1003.69 991.06,997.32 995.41,1001.67 1001.77,995.3 994.7,988.23 1001.06,981.87 1004.6,985.4 1010.67,979.33 1014,976 1014,961 1020,955 1045,955 1050,950 1050,925.87 1034.56,910.44 1034.56,909.02 1034.56,907.02 1039,907.02 1039,898.02 1029.56,898.02 1029.56,889.02 1039.56,889.02 1039.56,880.02 1034.56,880.02 1034.56,874.56 1028.11,868.11 1026.11,866.11 1026.11,858.65 1017.11,858.65 1017.11,868.65 1008.11,868.65 1008.11,858.65 999.11,858.65 999.11,868.65 990.11,868.65 990.11,863.65 986.57,863.65 RN6.2@949.5,863.65
  Top Layer w5: U1.K20@808.46,1454.49 v1(824.21,1470.24)
  MidLayer1 w3: v2(675,1041) 675,1044.7 683.23,1052.93 683.23,1090 683.23,1091.5 678.23,1091.5 678.23,1099.5 688.23,1099.5 688.23,1107.5 678.23,1107.5 678.23,1115.5 684.23,1115.5 684.23,1123.5 678.23,1123.5 678.23,1131.5 686.15,1131.5 686.15,1139.5 678.23,1139.5 678.23,1147.5 684.23,1147.5 684.23,1155.5 678.23,1155.5 678.23,1163.5 686.65,1163.5 686.65,1171.5 679.26,1171.5 679.26,1179.5 684.23,1179.5 684.23,1187.5 680.73,1187.5 680.73,1195.5 687.16,1195.5 687.16,1203.5 679.76,1203.5 679.76,1211.5 684.23,1211.5 684.23,1219.5 680.73,1219.5 680.73,1227.5 687.66,1227.5 687.66,1235.5 680.73,1235.5 680.73,1243.5 684.23,1243.5 684.23,1251.5 680.55,1251.5 680.55,1259.5 688.23,1259.5 688.23,1267.5 678.23,1267.5 678.23,1275.5 684.23,1275.5 684.23,1283.5 680.73,1283.5 680.73,1291.5 686.17,1291.5 686.17,1299.5 680.73,1299.5 680.73,1307.5 684.23,1307.5 684.23,1315.5 680.73,1315.5 680.73,1323.5 688.23,1323.5 688.23,1331.5 680.73,1331.5 680.73,1339.5 684.23,1339.5 684.23,1347.5 680.73,1347.5 680.73,1355.5 688.23,1355.5 688.23,1363.5 680.73,1363.5 680.73,1371.5 684.23,1371.5 684.23,1379.5 680.73,1379.5 680.73,1387.5 688.23,1387.5 688.23,1395.5 681.59,1395.5 681.59,1403.5 684.23,1403.5 684.23,1411.5 683.23,1411.5 683.23,1413.46 693.77,1424 799,1424 824.21,1449.21 v1(824.21,1470.24)
DDR_D7: RN6.1 U1.K17 | length 1589.5
  Top Layer w4: RN6.1@949.5,819.5 954,815 v2(1005,815)
  Top Layer w5: U1.K17@713.98,1454.49 714.09,1454.49 729.61,1470 v1(729.72,1470)
  MidLayer1 w3: v1(729.72,1470) 729.72,1471.03 749.72,1491.03 749.72,1508.5 757.23,1516.01 765.21,1516.01 776.22,1527.02 776.22,1539.72 786.23,1549.72 798.93,1549.72 809.21,1560.01 809.21,1570.94 818.28,1580 860,1580 866.75,1573.25
  MidLayer1 w4: 866.75,1573.25 925,1515 925,1505.75 925,1503.75 930,1503.75 930,1494.75 920,1494.75 920,1485.75 930,1485.75 930,1476.75 920,1476.75 920,1467.75 930,1467.75 930,1458.75 920,1458.75 920,1449.75 930,1449.75 930,1440.75 920,1440.75 920,1431.75 930,1431.75 930,1422.75 920,1422.75 920,1413.75 930,1413.75 930,1404.75 920,1404.75 920,1395.75 930,1395.75 930,1386.75 920,1386.75 920,1377.75 930,1377.75 930,1368.75 920,1368.75 920,1359.75 930,1359.75 930,1350.75 920,1350.75 920,1341.75 930,1341.75 930,1332.75 920,1332.75 920,1323.75 930,1323.75 930,1314.75 920,1314.75 920,1305.75 930,1305.75 930,1296.75 920,1296.75 920,1287.75 930,1287.75 930,1278.75 920,1278.75 920,1269.75 930,1269.75 930,1260.75 920,1260.75 920,1251.75 930,1251.75 930,1242.75 920,1242.75 920,1233.75 930,1233.75 930,1224.75 920,1224.75 920,1215.75 930,1215.75 930,1206.75 920,1206.75 920,1197.75 930,1197.75 930,1188.75 920,1188.75 920,1179.75 930,1179.75 930,1170.75 920,1170.75 920,1161.75 930,1161.75 930,1152.75 920,1152.75 920,1143.75 930,1143.75 930,1134.75 920,1134.75 920,1125.75 930,1125.75 930,1116.75 920,1116.75 920,1107.75 930,1107.75 930,1098.75 920,1098.75 920,1089.75 930,1089.75 930,1080.75 920,1080.75 920,1071.75 925,1071.75 925,1063.93 925,899.14 ccw(c959.14,899.14) 934.98,875.02 995,815 v2(1005,815)
DDR_D8: RN8.4 U1.K19 | length 1596.8
  Top Layer w3: RN8.4@438.15,945 440,946.85 440,969.66 440,971.16 435,971.16 435,979.16 445,979.16 445,987.16 440,987.16 440,992.47 442.53,995 451.26,1003.74 452.33,1004.8 448.79,1008.33 454.45,1013.99 461.52,1006.92 467.17,1012.57 463.64,1016.11 464.95,1017.42 471.22,1023.69 480,1023.69 489.5,1023.69 489.5,1018.69 497.5,1018.69 497.5,1023.69 505.5,1023.69 505.5,1018.69 513.5,1018.69 513.5,1023.69 521.5,1023.69 521.5,1018.69 529.5,1018.69 529.5,1023.69 537.5,1023.69 537.5,1018.69 545.5,1018.69 545.5,1028.69 553.5,1028.69 553.5,1023.69 556.56,1023.69 558.13,1023.69 566.77,1032.33 v2(569.09,1032.33)
  Top Layer w5: U1.K19@776.97,1454.49 777.09,1454.49 792.6,1470 v1(792.72,1470)
  MidLayer1 w3: v2(569.09,1032.33) 537.33,1032.33 520,1015 520,1007.88 520,1005.5 515.5,1005.5 515.5,997.5 525,997.5 525,989.5 515.5,989.5 515.5,981.5 520,981.5 520,980 520,970 528.76,961.24 545.64,961.24 559.39,975 564.95,975 570.5,975 570.5,979 578.5,979 578.5,972.5 586.5,972.5 586.5,979 594.5,979 594.5,972.5 602.5,972.5 602.5,979 610.5,979 610.5,972.5 618.5,972.5 618.5,975 620,975 628.24,975 630,976.76 630,988.24 628.24,990 620,990 611.16,990 611.16,985 603.16,985 603.16,995 595.16,995 595.16,985 587.16,985 587.16,995 579.16,995 579.16,985 571.16,985 571.16,995 563.16,995 563.16,985 555.16,985 555.16,995 547.16,995 547.16,990 545.66,990 536.76,990 535,991.76 535,1013.24 536.76,1015 550,1015 551.5,1015 551.5,1020 559.5,1020 559.5,1010 567.5,1010 567.5,1017.83 575.5,1017.83 575.5,1010 583.5,1010 583.5,1020 591.5,1020 591.5,1010 599.5,1010 599.5,1020 607.5,1020 607.5,1010 615.5,1010 615.5,1015 617.5,1015 625,1015 630,1020 631.06,1021.06 627.53,1024.6 633.18,1030.25 636.72,1026.72 642.37,1032.37 648.23,1038.23 648.23,1148.47 650,1150.24 650,1160 650,1161.5 647.8,1161.5 647.8,1169.5 655,1169.5 655,1177.5 649.24,1177.5 649.24,1185.5 652.73,1185.5 652.73,1193.5 648.31,1193.5 648.31,1201.5 650,1201.5 650,1205 650,1420 662,1432 777,1432 792.72,1447.72 v1(792.72,1470)